# Altium PCB BOARD_4LAYER.PcbDoc (part 18 of 21)
Units mil, origin at the board's own origin, x right, y up, seen from the top; angles counter-clockwise.
Board outline 6692.91 x 10039.37 mil, 4 copper layers (Top Layer, Mid Layer 1, Mid Layer 2, Bottom Layer), stack 66.299 mil thick; 1532 components, 908 nets, 4105 pads, 1286 vias.
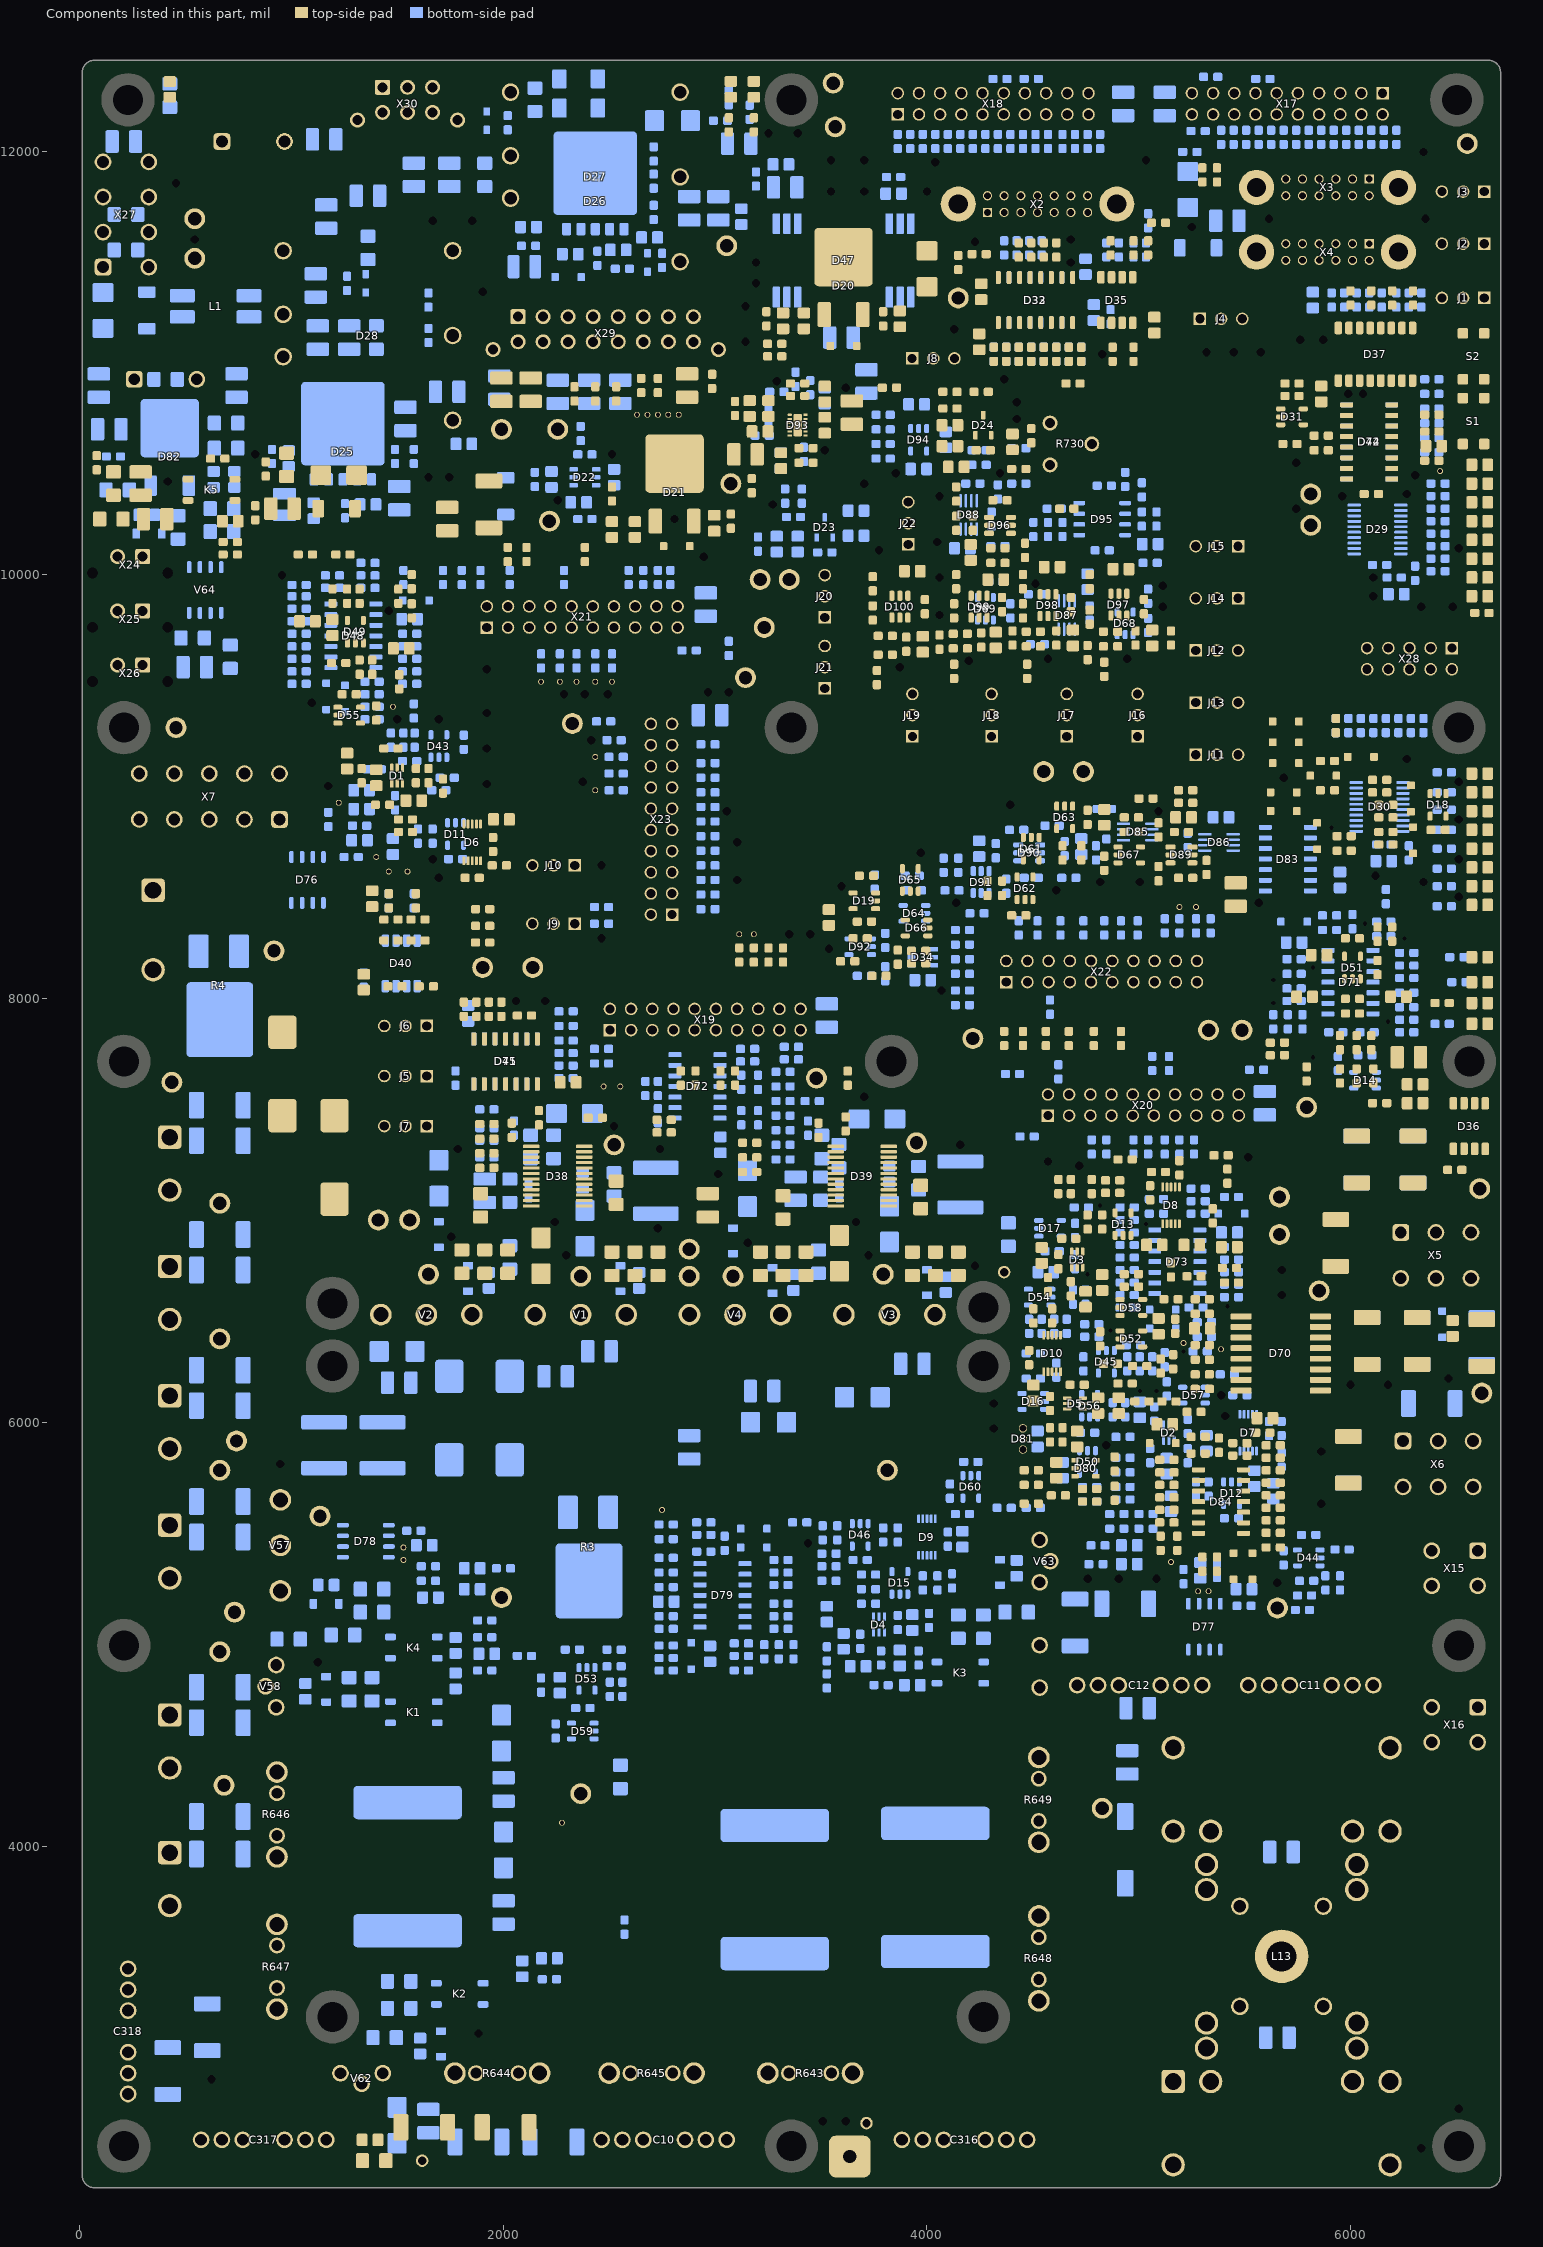
[diagram p20: the components of this part, seen from the top]

## Polygon pours and split planes (outlines as drawn) (continued)
$2N3800 on Bottom Layer "$2N3800_L02_P382" (solid, remove dead copper, pour order 382): 2188.98,7025.59 2238.19,7025.59 2238.19,7104.33 2188.98,7104.33
UL on Bottom Layer "UL_L02_P381" (solid, remove dead copper, pour order 381): 3665.35,6297.24 3192.91,6297.24 3192.91,5913.39 2513.78,5913.39 2513.78,6080.71 3025.59,6080.71 3025.59,6612.2 3163.39,6612.2 3163.39,6366.14 3527.56,6366.14 3527.56,6612.2 3665.35,6612.2
UL on Bottom Layer "UL_L02_P374" (solid, remove dead copper, pour order 374): 17 vertices, not listed, extent 673.23,5913.39 2218.5,8334.65
UL on Bottom Layer "UL_L02_P367" (solid, remove dead copper, pour order 367): 3931.1,6917.32 4009.84,6917.32 4009.84,7015.75 3931.1,7015.75
UL on Bottom Layer "UL_L02_P364" (solid, remove dead copper, pour order 364): 3025.59,6612.2 3124.02,6612.2 3124.02,6809.06 3025.59,6809.06
UL on Bottom Layer "UL_L02_P363" (solid, remove dead copper, pour order 363): 3163.39,6612.2 3124.02,6651.57 3124.02,6612.2
~U_TP on Bottom Layer "~U_TP_L02_P355" (solid, remove dead copper, pour order 355): 948.82,9013.78 131.89,9013.78 131.89,8334.65 614.17,8334.65 614.17,8137.8 407.48,8137.8 407.48,8059.06 43.31,8059.06 43.31,8334.65 33.46,8334.65 33.46,9112.2 948.82,9112.2
U_TP on Bottom Layer "U_TP_L02_P351" (solid, remove dead copper, pour order 351): 1066.93,8393.7 948.82,8393.7 948.82,8433.07 230.31,8433.07 230.31,8895.67 998.03,8895.67 998.03,8797.24 850.39,8797.24 850.39,8511.81 1066.93,8511.81
$2N2430 on Bottom Layer "$2N2430_L02_P349" (solid, remove dead copper, pour order 349): 2100.39,5726.38 1017.72,5726.38 1017.72,5844.49 1657.48,5844.49 1657.48,5903.54 2100.39,5903.54
U_MOST on Bottom Layer "U_MOST_L02_P344" (solid, remove dead copper, pour order 344): 1076.77,5529.53 1185.04,5529.53 1185.04,5667.32 1076.77,5667.32
U_MOST on Bottom Layer "U_MOST_L02_P339" (solid, remove dead copper, pour order 339): 2385.83,5500 2179.13,5500 2110.24,5568.9 1568.9,5568.9 1549.21,5588.58 1303.15,5588.58 1303.15,5450.79 1185.04,5450.79 1185.04,5667.32 1637.8,5667.32 1657.48,5647.64 2159.45,5647.64 2188.98,5677.17 2385.83,5677.17
I_MOST on Bottom Layer "I_MOST_L02_P338" (solid, remove dead copper, pour order 338): 1303.15,5342.52 879.92,5342.52 879.92,5490.16 1165.35,5490.16 1165.35,5440.94 1303.15,5440.94
I_MOST on Bottom Layer "I_MOST_L02_P336" (solid, remove dead copper, pour order 336): 1116.14,5322.83 1303.15,5322.83 1303.15,5342.52 1116.14,5342.52
UH on Bottom Layer "UH_L02_P329" (solid, remove dead copper, pour order 329): 2494.09,6907.48 2572.83,6907.48 2572.83,6986.22 2494.09,6986.22
UH on Bottom Layer "UH_L02_P320" (solid, remove dead copper, pour order 320): 2208.66,6139.76 1588.58,6139.76 1588.58,6730.31 1086.61,6730.31 1086.61,8511.81 1214.57,8511.81 1214.57,6838.58 1706.69,6838.58 1706.69,6366.14 2070.87,6366.14 2070.87,6612.2 2208.66,6612.2
PGND on Bottom Layer "PGND_L02_P315" (solid, remove dead copper, pour order 315): 3960.63,5883.86 4118.11,5883.86 4118.11,6415.35 3960.63,6415.35
PGND on Bottom Layer "PGND_L02_P290" (solid, remove dead copper, pour order 290): 1342.52,6139.76 1480.32,6139.76 1480.32,6641.73 1342.52,6641.73
PGND on Bottom Layer "PGND_L02_P284" (solid, remove dead copper, pour order 284): 3251.97,6061.02 3291.34,6061.02 3291.34,6218.5 3251.97,6218.5
PGND on Bottom Layer "PGND_L02_P283" (solid, remove dead copper, pour order 283): 3291.34,5913.39 3655.51,5913.39 3655.51,6218.5 3291.34,6218.5
PGND on Bottom Layer "PGND_L02_P263" (solid, remove dead copper, pour order 263): 23 vertices, not listed, extent 33.46,2409.45 1824.8,4751.97
PGND on Bottom Layer "PGND_L02_P262" (solid, remove dead copper, pour order 262): 309.06,4751.97 250,4692.91 250,4751.97
PGND on Bottom Layer "PGND_L02_P261" (solid, remove dead copper, pour order 261): 43.31,4751.97 427.17,4751.97 427.17,5165.35 43.31,5165.35
PGND on Bottom Layer "PGND_L02_P254" (solid, remove dead copper, pour order 254): 151.57,5765.75 486.22,5765.75 486.22,5982.28 151.57,5982.28
PGND on Bottom Layer "PGND_L02_P248" (solid, remove dead copper, pour order 248): 466.54,5165.35 33.46,5165.35 33.46,7192.91 486.22,7192.91 486.22,6917.32 151.57,6917.32 151.57,6562.99 505.91,6562.99 505.91,6326.77 151.57,6326.77 151.57,5342.52 466.54,5342.52
PGND on Bottom Layer "PGND_L02_P247" (solid, remove dead copper, pour order 247): 1824.8,2409.45 3104.33,2409.45 3104.33,2448.82 1824.8,2448.82
PGND on Bottom Layer "PGND_L02_P246" (solid, remove dead copper, pour order 246): 2809.06,2448.82 3104.33,2448.82 3104.33,2645.67 2809.06,2645.67
PGND on Bottom Layer "PGND_L02_P235" (solid, remove dead copper, pour order 235): 4462.6,3531.5 4600.39,3531.5 4600.39,3787.4 4462.6,3787.4
PGND on Bottom Layer "PGND_L02_P207" (solid, remove dead copper, pour order 207): 3281.5,6868.11 3360.24,6868.11 3360.24,6966.54 3281.5,6966.54
PGND on Bottom Layer "PGND_L02_P206" (solid, remove dead copper, pour order 206): 2937.01,6169.29 2494.09,6169.29 2494.09,6415.35 2779.53,6415.35 2779.53,6868.11 2937.01,6868.11
PGND on Bottom Layer "PGND_L02_P195" (solid, remove dead copper, pour order 195): 1372.05,6927.17 1618.11,6927.17 1618.11,7045.28 1372.05,7045.28
PGND on Bottom Layer "PGND_L02_P194" (solid, remove dead copper, pour order 194): 1076.77,8777.56 1057.09,8777.56 1057.09,9190.94 574.8,9190.94 574.8,9427.17 43.31,9427.17 43.31,9446.85 594.49,9446.85 594.49,9210.63 1076.77,9210.63
PGND on Bottom Layer "PGND_L02_P193" (solid, remove dead copper, pour order 193): 1372.05,6927.17 1342.52,6927.17 1342.52,7645.67 1273.62,7645.67 1273.62,8511.81 1293.31,8511.81 1293.31,7675.2 1372.05,7675.2
PGND on Bottom Layer "PGND_L02_P188" (solid, remove dead copper, pour order 188): 33.46,9387.8 574.8,9387.8 574.8,9427.17 33.46,9427.17
PGND on Bottom Layer "PGND_L02_P185" (solid, remove dead copper, pour order 185): 4561.02,4299.21 4305.12,4299.21 4305.12,3925.2 3773.62,3925.2 3773.62,4299.21 3094.49,4299.21 3094.49,4683.07 4393.7,4683.07 4393.7,4456.69 4561.02,4456.69
PGND on Bottom Layer "PGND_L02_P183" (solid, remove dead copper, pour order 183): 3970.47,5627.95 2681.1,5627.95 2681.1,5421.26 2631.89,5421.26 2631.89,5431.1 2671.26,5431.1 2671.26,5637.8 3960.63,5637.8 3960.63,5883.86 3970.47,5883.86
PGND on Bottom Layer "PGND_L02_P182" (solid, remove dead copper, pour order 182): 2159.45,5007.87 2631.89,5007.87 2631.89,5450.79 2159.45,5450.79
PGND on Bottom Layer "PGND_L02_P181" (solid, remove dead copper, pour order 181): 1765.75,5440.94 2159.45,5440.94 2159.45,5450.79 1765.75,5450.79
PGND on Bottom Layer "PGND_L02_P180" (solid, remove dead copper, pour order 180): 1765.75,5372.05 2159.45,5372.05 2159.45,5440.94 1765.75,5440.94
$2N2408 on Bottom Layer "$2N2408_L02_P167" (solid, remove dead copper, pour order 167): 3744.09,6612.2 3852.36,6612.2 3852.36,6700.79 3744.09,6700.79
$2N2408 on Bottom Layer "$2N2408_L02_P166" (solid, remove dead copper, pour order 166): 3744.09,6612.2 3763.78,6592.52 3763.78,6612.2
$2N2408 on Bottom Layer "$2N2408_L02_P165" (solid, remove dead copper, pour order 165): 3852.36,6651.57 3891.73,6612.2 3852.36,6612.2
$2N2408 on Bottom Layer "$2N2408_L02_P158" (solid, remove dead copper, pour order 158): 3891.73,5706.69 2572.83,5706.69 2572.83,5500 2405.51,5500 2405.51,5706.69 2297.24,5706.69 2297.24,6740.16 2435.04,6740.16 2435.04,5844.49 3763.78,5844.49 3763.78,6612.2 3891.73,6612.2
U_TS on Bottom Layer "U_TS_L02_P156" (solid, remove dead copper, pour order 156): 6175.2,5637.8 6332.68,5637.8 6332.68,5933.07 6175.2,5933.07
U_TS on Bottom Layer "U_TS_L02_P149" (solid, remove dead copper, pour order 149): 5761.81,6070.87 5919.29,6070.87 5919.29,6307.09 5761.81,6307.09
U_Fin on Bottom Layer "U_FIN_L02_P148" (solid, remove dead copper, pour order 148): 6155.51,6661.42 6312.99,6661.42 6312.99,7015.75 6155.51,7015.75
U_Fin on Bottom Layer "U_FIN_L02_P138" (solid, remove dead copper, pour order 138): 5919.29,6346.46 5761.81,6346.46 5761.81,6681.1 5860.24,6779.53 5919.29,6779.53
U_Fin on Bottom Layer "U_FIN_L02_P137" (solid, remove dead copper, pour order 137): 5919.29,6661.42 6155.51,6661.42 6155.51,6779.53 5919.29,6779.53
~U_TS on Bottom Layer "~U_TS_L02_P133" (solid, remove dead copper, pour order 133): 6529.53,5637.8 6687.01,5637.8 6687.01,6287.4 6529.53,6287.4
~U_Fin on Bottom Layer "~U_FIN_L02_P129" (solid, remove dead copper, pour order 129): 6509.84,6464.57 6687.01,6464.57 6687.01,7212.6 6509.84,7212.6
+U_POWER on Bottom Layer "+U_POWER_L02_P127" (solid, remove dead copper, pour order 127): 820.87,3846.46 742.13,3846.46 742.13,3196.85 230.31,3196.85 230.31,3511.81 643.7,3511.81 643.7,7586.61 820.87,7586.61
+U_POWER on Bottom Layer "+U_POWER_L02_P126" (solid, remove dead copper, pour order 126): 820.87,4476.38 1293.31,4476.38 1293.31,4574.8 820.87,4574.8
+U_POWER on Bottom Layer "+U_POWER_L02_P125" (solid, remove dead copper, pour order 125): 1194.88,4338.58 1293.31,4338.58 1293.31,4476.38 1194.88,4476.38
+U_POWER on Bottom Layer "+U_POWER_L02_P121" (solid, remove dead copper, pour order 121): 820.87,5125.98 1017.72,5125.98 1017.72,5283.46 820.87,5283.46
+U_POWER on Bottom Layer "+U_POWER_L02_P120" (solid, remove dead copper, pour order 120): 1194.88,4043.31 1844.49,4043.31 1844.49,4476.38 1194.88,4476.38
+U_POWER on Bottom Layer "+U_POWER_L02_P119" (solid, remove dead copper, pour order 119): 1844.49,4299.21 2080.71,4299.21 2080.71,4476.38 1844.49,4476.38
$6N134 on Bottom Layer "$6N134_L02_P118" (solid, remove dead copper, pour order 118): 860.24,3846.46 1057.09,3846.46 1057.09,4102.36 860.24,4102.36
$6N134 on Bottom Layer "$6N134_L02_P107" (solid, remove dead copper, pour order 107): 1293.31,2822.83 1372.05,2822.83 1372.05,2901.57 1293.31,2901.57
$6N134 on Bottom Layer "$6N134_L02_P106" (solid, remove dead copper, pour order 106): 1372.05,2724.41 860.24,2724.41 860.24,3393.7 1017.72,3393.7 1017.72,2822.83 1372.05,2822.83
$6N135 on Bottom Layer "$6N135_L02_P102" (solid, remove dead copper, pour order 102): 1923.23,3708.66 2425.2,3708.66 2425.2,3944.88 1923.23,3944.88
$6N135 on Bottom Layer "$6N135_L02_P099" (solid, remove dead copper, pour order 99): 840.55,3492.13 1844.49,3492.13 1844.49,3748.03 840.55,3748.03
$6N135 on Bottom Layer "$6N135_L02_P097" (solid, remove dead copper, pour order 97): 879.92,4181.1 1057.09,4181.1 1057.09,4417.32 879.92,4417.32
$6N135 on Bottom Layer "$6N135_L02_P091" (solid, remove dead copper, pour order 91): 1194.88,3748.03 1844.49,3748.03 1844.49,3807.09 1194.88,3807.09
$6N135 on Bottom Layer "$6N135_L02_P090" (solid, remove dead copper, pour order 90): 1844.49,3708.66 1923.23,3708.66 1923.23,3807.09 1844.49,3807.09
$6N3156 on Bottom Layer "$6N3156_L02_P080" (solid, remove dead copper, pour order 80): 3616.14,3885.83 2927.17,3885.83 2927.17,3078.74 2966.54,3078.74 2966.54,2881.89 2750,2881.89 2750,3925.2 3064.96,4240.16 3616.14,4240.16
$6N3156 on Bottom Layer "$6N3156_L02_P079" (solid, remove dead copper, pour order 79): 2927.17,3078.74 3498.03,3078.74 3498.03,3137.8 2927.17,3137.8
$6N3156 on Bottom Layer "$6N3156_L02_P078" (solid, remove dead copper, pour order 78): 2297.24,3118.11 2750,3118.11 2750,3196.85 2297.24,3196.85
$6N3156 on Bottom Layer "$6N3156_L02_P068" (solid, remove dead copper, pour order 68): 3498.03,2842.52 3734.25,2842.52 3734.25,3137.8 3498.03,3137.8
$6N3156 on Bottom Layer "$6N3156_L02_P066" (solid, remove dead copper, pour order 66): 2021.65,2901.57 2297.24,2901.57 2297.24,3196.85 2021.65,3196.85
$6N106 on Bottom Layer "$6N106_L02_P063" (solid, remove dead copper, pour order 63): 2730.32,2724.41 3124.02,2724.41 3124.02,2783.46 2730.32,2783.46
$6N106 on Bottom Layer "$6N106_L02_P062" (solid, remove dead copper, pour order 62): 3124.02,2724.41 3183.07,2783.46 3124.02,2783.46
$6N106 on Bottom Layer "$6N106_L02_P060" (solid, remove dead copper, pour order 60): 17 vertices, not listed, extent 1431.1,2527.56 3419.29,3059.06
$6N3315 on Bottom Layer "$6N3315_L02_P047" (solid, remove dead copper, pour order 47): 4442.91,3944.88 4600.39,3944.88 4600.39,4181.1 4442.91,4181.1
$6N3315 on Bottom Layer "$6N3315_L02_P046" (solid, remove dead copper, pour order 46): 4462.6,3196.85 4620.08,3196.85 4620.08,3413.39 4462.6,3413.39
+U_AMP on Bottom Layer "+U_AMP_L02_P043" (solid, remove dead copper, pour order 43): 6687.01,5362.2 6273.62,5362.2 6273.62,5027.56 6312.99,4988.19 6312.99,4771.65 6687.01,4771.65 6687.01,4633.86 6214.57,4633.86 6214.57,4870.08 5328.74,4870.08 5328.74,5007.87 6175.2,5007.87 6175.2,5460.63 6687.01,5460.63
$6N94 on Bottom Layer "$6N94_L02_P035" (solid, remove dead copper, pour order 35): 5564.96,2842.52 4856.3,2842.52 4856.3,3472.44 5427.17,3472.44 5427.17,3314.96 5564.96,3314.96
$6N94 on Bottom Layer "$6N94_L02_P031" (solid, remove dead copper, pour order 31): 4127.95,2409.45 3812.99,2409.45 3812.99,3196.85 3025.59,3196.85 3025.59,3688.98 3616.14,3688.98 3616.14,3295.28 3911.42,3295.28 3911.42,2763.78 4127.95,2763.78
$6N101 on Bottom Layer "$6N101_L02_P027" (solid, remove dead copper, pour order 27): 5722.44,4673.23 5584.65,4535.43 5584.65,3669.29 5486.22,3669.29 5486.22,3590.55 4856.3,3590.55 4856.3,3925.2 5072.83,3925.2 5072.83,4555.12 5427.17,4555.12 5427.17,4771.65 5722.44,4771.65
$6N737 on Bottom Layer "$6N737_L02_P023" (solid, remove dead copper, pour order 23): 4226.38,2507.87 5033.46,2507.87 5033.46,2625.98 4226.38,2625.98
$6N737 on Bottom Layer "$6N737_L02_P022" (solid, remove dead copper, pour order 22): 4226.38,2625.98 5742.13,2625.98 5742.13,2724.41 4226.38,2724.41
$6N737 on Bottom Layer "$6N737_L02_P021" (solid, remove dead copper, pour order 21): 6687.01,2803.15 6293.31,2803.15 6293.31,2409.45 5742.13,2409.45 5742.13,3295.28 5879.92,3295.28 5879.92,3472.44 6687.01,3472.44
$6N737 on Bottom Layer "$6N737_L02_P020" (solid, remove dead copper, pour order 20): 5289.37,2409.45 5742.13,2409.45 5742.13,2625.98 5289.37,2625.98
$6N737 on Bottom Layer "$6N737_L02_P016" (solid, remove dead copper, pour order 16): 4777.56,2724.41 4226.38,2724.41 4226.38,2842.52 3990.16,2842.52 3990.16,3374.02 3753.94,3374.02 3753.94,3629.92 4324.8,3629.92 4324.8,3374.02 4088.58,3374.02 4088.58,2980.32 4777.56,2980.32
-U_AMP on Bottom Layer "-U_AMP_L02_P012" (solid, remove dead copper, pour order 12): 6352.36,5165.35 6687.01,5165.35 6687.01,5263.78 6352.36,5263.78
-U_AMP on Bottom Layer "-U_AMP_L02_P011" (solid, remove dead copper, pour order 11): 6687.01,3590.55 5879.92,3590.55 5879.92,3669.29 5761.81,3669.29 5761.81,4437.01 5840.55,4515.75 5840.55,4771.65 6135.83,4771.65 6135.83,4515.75 6687.01,4515.75
no net on Bottom Layer (solid, remove dead copper, pour order 0): 1598.43,5913.39 1647.64,5962.6 1598.43,5962.6
I_AMP on Mid Layer 1 "I_AMP_L-01_P645" (solid, remove dead copper, pour order 645): 4935.04,4692.91 4620.08,4692.91 4620.08,4889.76 4501.97,4889.76 4501.97,5007.87 4935.04,5007.87
GND_UM on Mid Layer 1 "GND_UM_L-01_P597" (solid, remove dead copper, pour order 597): 5153.54,9190.94 3468.5,9190.94 3468.5,10017.72 3793.31,10017.72 3793.31,11051.18 4187.01,11051.18 4187.01,10775.59 4531.5,10775.59 4531.5,10578.74 5153.54,10578.74
GND_UM on Mid Layer 1 "GND_UM_L-01_P596" (solid, remove dead copper, pour order 596): 4059.06,11051.18 4187.01,11051.18 4187.01,11080.71 4059.06,11080.71
GND_UM on Mid Layer 1 "GND_UM_L-01_P595" (solid, remove dead copper, pour order 595): 22 vertices, not listed, extent 3242.13,11080.71 6687.01,12389.76
GND_UM on Mid Layer 1 "GND_UM_L-01_P594" (solid, remove dead copper, pour order 594): 4187.01,10992.13 4275.59,11080.71 4187.01,11080.71
$4N2819 on Mid Layer 1 "$4N2819_L-01_P589" (solid, remove dead copper, pour order 589): 2120.08,11877.95 1942.91,11877.95 1942.91,11700.79 1165.35,11700.79 1165.35,12074.8 2120.08,12074.8
$4N2811 on Mid Layer 1 "$4N2811_L-01_P582" (solid, remove dead copper, pour order 582): 1972.44,11700.79 2120.08,11700.79 2120.08,11838.58 1972.44,11838.58
$4N2807 on Mid Layer 1 "$4N2807_L-01_P581" (solid, remove dead copper, pour order 581): 1559.06,10972.44 1076.77,10972.44 1076.77,11120.08 899.61,11120.08 899.61,11671.26 1559.06,11671.26
$4N2807 on Mid Layer 1 "$4N2807_L-01_P579" (solid, remove dead copper, pour order 579): 909.45,11169.29 1047.24,11169.29 1047.24,11287.4 909.45,11287.4
$4N2806 on Mid Layer 1 "$4N2806_L-01_P571" (solid, remove dead copper, pour order 571): 899.61,10972.44 1047.24,10972.44 1047.24,11090.55 899.61,11090.55
$4N4014 on Mid Layer 1 "$4N4014_L-01_P566" (solid, remove dead copper, pour order 566): 427.17,9761.81 683.07,9761.81 683.07,9899.61 427.17,9899.61
$4N4014 on Mid Layer 1 "$4N4014_L-01_P563" (solid, remove dead copper, pour order 563): 535.43,9496.06 250,9496.06 250,9692.91 427.17,9692.91 427.17,9761.81 535.43,9761.81
$4N4005 on Mid Layer 1 "$4N4005_L-01_P559" (solid, remove dead copper, pour order 559): 250,9742.13 397.64,9742.13 397.64,10175.2 250,10175.2
$4N4005 on Mid Layer 1 "$4N4005_L-01_P553" (solid, remove dead copper, pour order 553): 397.64,9948.82 624.02,9948.82 624.02,10175.2 397.64,10175.2
$4N4008 on Mid Layer 1 "$4N4008_L-01_P550" (solid, remove dead copper, pour order 550): 279.53,10549.21 584.65,10549.21 584.65,10834.65 279.53,10834.65
$4N4016 on Mid Layer 1 "$4N4016_L-01_P543" (solid, remove dead copper, pour order 543): 33.46,9496.06 210.63,9496.06 210.63,10824.8 33.46,10824.8
$4N4016 on Mid Layer 1 "$4N4016_L-01_P542" (solid, remove dead copper, pour order 542): 791.34,10214.57 210.63,10214.57 210.63,10490.16 702.76,10490.16 702.76,10834.65 791.34,10834.65
$4N4016 on Mid Layer 1 "$4N4016_L-01_P538" (solid, remove dead copper, pour order 538): 555.12,9496.06 683.07,9496.06 683.07,9742.13 555.12,9742.13
-U_VENT on Mid Layer 1 "-U_VENT_L-01_P531" (solid, remove dead copper, pour order 531): 1037.4,11710.63 1125.98,11710.63 1125.98,12114.17 1037.4,12114.17
-U_VENT on Mid Layer 1 "-U_VENT_L-01_P530" (solid, remove dead copper, pour order 530): 1037.4,12232.28 1322.83,12232.28 1322.83,12389.76 1037.4,12389.76
-U_VENT on Mid Layer 1 "-U_VENT_L-01_P529" (solid, remove dead copper, pour order 529): 1037.4,11710.63 870.08,11710.63 870.08,10864.17 417.32,10864.17 417.32,10992.13 761.81,10992.13 761.81,12389.76 1037.4,12389.76
-U_VENT on Mid Layer 1 "-U_VENT_L-01_P523" (solid, remove dead copper, pour order 523): 1037.4,12114.17 1657.48,12114.17 1657.48,12232.28 1037.4,12232.28
-U_VENT on Mid Layer 1 "-U_VENT_L-01_P522" (solid, remove dead copper, pour order 522): 338.58,12350.39 761.81,12350.39 761.81,12389.76 338.58,12389.76
+U_VENT on Mid Layer 1 "+U_VENT_L-01_P505" (solid, remove dead copper, pour order 505): 732.28,11021.65 387.8,11021.65 387.8,10864.17 43.31,10864.17 43.31,11070.87 624.02,11070.87 624.02,11838.58 515.75,11838.58 515.75,12320.87 732.28,12320.87
+U_VENT on Mid Layer 1 "+U_VENT_L-01_P504" (solid, remove dead copper, pour order 504): 377.95,12271.65 515.75,12271.65 515.75,12320.87 377.95,12320.87
$4N2816 on Mid Layer 1 "$4N2816_L-01_P500" (solid, remove dead copper, pour order 500): 43.31,11090.55 594.49,11090.55 594.49,11248.03 43.31,11248.03
-U_UM on Mid Layer 1 "-U_UM_L-01_P493" (solid, remove dead copper, pour order 493): 250,11366.14 417.32,11366.14 417.32,12094.49 250,12094.49
+U_UM on Mid Layer 1 "+U_UM_L-01_P490" (solid, remove dead copper, pour order 490): 43.31,11277.56 190.94,11277.56 190.94,12094.49 43.31,12094.49
+15V on Mid Layer 1 "+15V_L-01_P480" (solid, remove dead copper, pour order 480): 3527.56,7409.45 3576.77,7409.45 3576.77,7488.19 3527.56,7488.19
+15V on Mid Layer 1 "+15V_L-01_P478" (solid, remove dead copper, pour order 478): 2080.71,7438.98 2129.92,7438.98 2129.92,7517.72 2080.71,7517.72
GND on Mid Layer 1 "GND_L-01_P398" (solid, remove dead copper, pour order 398): 35 vertices, not listed, extent 1401.57,3324.8 4413.39,6110.24
GND on Mid Layer 1 "GND_L-01_P392" (solid, remove dead copper, pour order 392): 72 vertices, not listed, extent 692.91,5116.14 6687.01,12389.76
GND on Mid Layer 1 "GND_L-01_P391" (solid, remove dead copper, pour order 391): 3379.92,7517.72 3596.46,7517.72 3596.46,7606.3 3379.92,7606.3
$2N3778 on Mid Layer 1 "$2N3778_L-01_P388" (solid, remove dead copper, pour order 388): 3625.98,7025.59 3694.88,7025.59 3694.88,7104.33 3625.98,7104.33
$2N3800 on Mid Layer 1 "$2N3800_L-01_P384" (solid, remove dead copper, pour order 384): 2188.98,7025.59 2287.4,7025.59 2287.4,7104.33 2188.98,7104.33
UL on Mid Layer 1 "UL_L-01_P377" (solid, remove dead copper, pour order 377): 2513.78,5913.39 2720.47,5913.39 2720.47,6100.39 2513.78,6100.39
UL on Mid Layer 1 "UL_L-01_P376" (solid, remove dead copper, pour order 376): 2218.5,5913.39 2139.76,5913.39 2139.76,5962.6 2011.81,5962.6 2011.81,6090.55 2218.5,6090.55
UL on Mid Layer 1 "UL_L-01_P372" (solid, remove dead copper, pour order 372): 663.39,8137.8 889.76,8137.8 889.76,8334.65 663.39,8334.65
UL on Mid Layer 1 "UL_L-01_P371" (solid, remove dead copper, pour order 371): 889.76,8000 1007.87,8000 1007.87,8334.65 889.76,8334.65
UL on Mid Layer 1 "UL_L-01_P361" (solid, remove dead copper, pour order 361): 20 vertices, not listed, extent 3025.59,6326.77 4265.75,7242.13
~U_TP on Mid Layer 1 "~U_TP_L-01_P356" (solid, remove dead copper, pour order 356): 958.66,9013.78 141.73,9013.78 141.73,8334.65 624.02,8334.65 624.02,8137.8 417.32,8137.8 417.32,8059.06 53.15,8059.06 53.15,8334.65 43.31,8334.65 43.31,9112.2 958.66,9112.2
U_TP on Mid Layer 1 "U_TP_L-01_P353" (solid, remove dead copper, pour order 353): 1066.93,8433.07 230.31,8433.07 230.31,8895.67 998.03,8895.67 998.03,8797.24 850.39,8797.24 850.39,8511.81 1066.93,8511.81
$2N2430 on Mid Layer 1 "$2N2430_L-01_P347" (solid, remove dead copper, pour order 347): 1559.06,5716.54 1647.64,5716.54 1647.64,5854.33 1559.06,5854.33
U_MOST on Mid Layer 1 "U_MOST_L-01_P341" (solid, remove dead copper, pour order 341): 2169.29,5490.16 2248.03,5490.16 2248.03,5696.85 2169.29,5696.85
U_MOST on Mid Layer 1 "U_MOST_L-01_P340" (solid, remove dead copper, pour order 340): 1096.46,5529.53 1283.46,5529.53 1283.46,5627.95 1096.46,5627.95
I_MOST on Mid Layer 1 "I_MOST_L-01_P332" (solid, remove dead copper, pour order 332): 1116.14,5322.83 1204.72,5322.83 1204.72,5460.63 1116.14,5460.63
I_MOST on Mid Layer 1 "I_MOST_L-01_P331" (solid, remove dead copper, pour order 331): 870.08,5342.52 1037.4,5342.52 1037.4,5500 870.08,5500
UH on Mid Layer 1 "UH_L-01_P327" (solid, remove dead copper, pour order 327): 1086.61,6917.32 1214.57,6917.32 1214.57,7192.91 1086.61,7192.91
UH on Mid Layer 1 "UH_L-01_P325" (solid, remove dead copper, pour order 325): 1076.77,8187.01 1224.41,8187.01 1224.41,8383.86 1076.77,8383.86
UH on Mid Layer 1 "UH_L-01_P319" (solid, remove dead copper, pour order 319): 18 vertices, not listed, extent 2120.08,6612.2 2838.58,7232.28
UH on Mid Layer 1 "UH_L-01_P318" (solid, remove dead copper, pour order 318): 2208.66,6326.77 1588.58,6326.77 1588.58,6759.84 1706.69,6759.84 1706.69,6366.14 2070.87,6366.14 2070.87,6612.2 2208.66,6612.2
PGND on Mid Layer 1 "PGND_L-01_P308" (solid, remove dead copper, pour order 308): 2169.29,7064.96 2061.02,7064.96 2061.02,6809.06 1952.76,6809.06 1952.76,6690.94 2021.65,6690.94 1952.76,6622.05 1952.76,6612.2 1795.28,6612.2 1795.28,6809.06 1480.32,6809.06 1480.32,7055.12 1903.54,7055.12 1903.54,7153.54 2169.29,7153.54
PGND on Mid Layer 1 "PGND_L-01_P304" (solid, remove dead copper, pour order 304): 2061.02,6736.88 2021.65,6690.94 1952.76,6690.94 1952.76,6809.06 2061.02,6809.06
PGND on Mid Layer 1 "PGND_L-01_P302" (solid, remove dead copper, pour order 302): 1342.52,6139.76 1480.32,6139.76 1480.32,7055.12 1342.52,7055.12
PGND on Mid Layer 1 "PGND_L-01_P294" (solid, remove dead copper, pour order 294): 496.06,7714.57 830.71,7714.57 830.71,8078.74 496.06,8078.74
PGND on Mid Layer 1 "PGND_L-01_P288" (solid, remove dead copper, pour order 288): 3291.34,5893.7 3714.57,5893.7 3714.57,6179.13 3291.34,6179.13
PGND on Mid Layer 1 "PGND_L-01_P277" (solid, remove dead copper, pour order 277): 2937.01,6169.29 2533.46,6169.29 2533.46,6415.35 2779.53,6415.35 2779.53,6612.2 2937.01,6612.2
PGND on Mid Layer 1 "PGND_L-01_P259" (solid, remove dead copper, pour order 259): 250,4653.54 348.43,4751.97 250,4751.97
PGND on Mid Layer 1 "PGND_L-01_P257" (solid, remove dead copper, pour order 257): 35 vertices, not listed, extent 33.46,2409.45 1824.8,7192.91
PGND on Mid Layer 1 "PGND_L-01_P253" (solid, remove dead copper, pour order 253): 151.57,5716.54 486.22,5716.54 486.22,5972.44 151.57,5972.44
PGND on Mid Layer 1 "PGND_L-01_P250" (solid, remove dead copper, pour order 250): 2809.06,2566.93 3143.7,2566.93 3143.7,2704.72 2809.06,2704.72
PGND on Mid Layer 1 "PGND_L-01_P243" (solid, remove dead copper, pour order 243): 1824.8,2409.45 3143.7,2409.45 3143.7,2468.5 1824.8,2468.5
PGND on Mid Layer 1 "PGND_L-01_P242" (solid, remove dead copper, pour order 242): 2809.06,2468.5 3143.7,2468.5 3143.7,2566.93 2809.06,2566.93
PGND on Mid Layer 1 "PGND_L-01_P240" (solid, remove dead copper, pour order 240): 4561.02,4299.21 4305.12,4299.21 4305.12,3925.2 3773.62,3925.2 3773.62,4456.69 4561.02,4456.69
PGND on Mid Layer 1 "PGND_L-01_P237" (solid, remove dead copper, pour order 237): 4561.02,3531.5 4442.91,3531.5 4442.91,3787.4 3773.62,3787.4 3773.62,3925.2 4305.12,3925.2 4305.12,3846.46 4561.02,3846.46
PGND on Mid Layer 1 "PGND_L-01_P233" (solid, remove dead copper, pour order 233): 2139.76,3275.59 1923.23,3275.59 1923.23,3078.74 1667.32,3078.74 1667.32,3295.28 2041.34,3295.28 2041.34,4555.12 1431.1,4555.12 1431.1,4653.54 2139.76,4653.54
PGND on Mid Layer 1 "PGND_L-01_P230" (solid, remove dead copper, pour order 230): 2218.5,5057.09 2562.99,5057.09 2562.99,5440.94 2218.5,5440.94
PGND on Mid Layer 1 "PGND_L-01_P215" (solid, remove dead copper, pour order 215): 3960.63,5893.7 4118.11,5893.7 4118.11,6415.35 3960.63,6415.35
PGND on Mid Layer 1 "PGND_L-01_P210" (solid, remove dead copper, pour order 210): 1431.1,4653.54 1598.43,4653.54 1598.43,4919.29 1431.1,4919.29
PGND on Mid Layer 1 "PGND_L-01_P209" (solid, remove dead copper, pour order 209): 1431.1,4791.34 1312.99,4791.34 1312.99,5263.78 1381.89,5263.78 1381.89,4919.29 1431.1,4919.29
PGND on Mid Layer 1 "PGND_L-01_P205" (solid, remove dead copper, pour order 205): 2779.53,6612.2 2828.74,6671.26 2828.74,6612.2
PGND on Mid Layer 1 "PGND_L-01_P201" (solid, remove dead copper, pour order 201): 3606.3,7064.96 3458.66,7064.96 3458.66,6681.1 3222.44,6681.1 3222.44,6799.21 2937.01,6799.21 2937.01,6612.2 2828.74,6612.2 2828.74,6907.48 3183.07,6907.48 3183.07,7153.54 3606.3,7153.54
PGND on Mid Layer 1 "PGND_L-01_P200" (solid, remove dead copper, pour order 200): 2897.64,6907.48 3183.07,6907.48 3183.07,7025.59 2897.64,7025.59
PGND on Mid Layer 1 "PGND_L-01_P196" (solid, remove dead copper, pour order 196): 19 vertices, not listed, extent 43.31,6799.21 1372.05,9446.85
PGND on Mid Layer 1 "PGND_L-01_P190" (solid, remove dead copper, pour order 190): 33.46,9397.64 574.8,9397.64 574.8,9427.17 33.46,9427.17
PGND on Mid Layer 1 "PGND_L-01_P187" (solid, remove dead copper, pour order 187): 3773.62,4309.06 3045.28,4309.06 2750,4013.78 2750,4190.94 3015.75,4456.69 3773.62,4456.69
$2N2408 on Mid Layer 1 "$2N2408_L-01_P175" (solid, remove dead copper, pour order 175): 3753.94,6395.67 3901.57,6395.67 3901.57,6622.05 3753.94,6622.05
$2N2408 on Mid Layer 1 "$2N2408_L-01_P173" (solid, remove dead copper, pour order 173): 3005.91,5706.69 3891.73,5706.69 3891.73,5834.65 3005.91,5834.65
$2N2408 on Mid Layer 1 "$2N2408_L-01_P170" (solid, remove dead copper, pour order 170): 3744.09,6622.05 3852.36,6622.05 3852.36,6700.79 3744.09,6700.79
$2N2408 on Mid Layer 1 "$2N2408_L-01_P169" (solid, remove dead copper, pour order 169): 2297.24,6385.83 2444.88,6385.83 2444.88,6690.94 2297.24,6690.94
$2N2408 on Mid Layer 1 "$2N2408_L-01_P162" (solid, remove dead copper, pour order 162): 3744.09,6622.05 3753.94,6612.2 3753.94,6622.05
$2N2408 on Mid Layer 1 "$2N2408_L-01_P161" (solid, remove dead copper, pour order 161): 3852.36,6671.26 3901.57,6622.05 3852.36,6622.05
U_TS on Mid Layer 1 "U_TS_L-01_P154" (solid, remove dead copper, pour order 154): 6175.2,5637.8 6312.99,5637.8 6312.99,5933.07 6175.2,5933.07
U_TS on Mid Layer 1 "U_TS_L-01_P151" (solid, remove dead copper, pour order 151): 5761.81,6070.87 5919.29,6070.87 5919.29,6307.09 5761.81,6307.09
U_Fin on Mid Layer 1 "U_FIN_L-01_P146" (solid, remove dead copper, pour order 146): 6155.51,6661.42 6312.99,6661.42 6312.99,7015.75 6155.51,7015.75
U_Fin on Mid Layer 1 "U_FIN_L-01_P142" (solid, remove dead copper, pour order 142): 5919.29,6346.46 5761.81,6346.46 5761.81,6681.1 5860.24,6779.53 5919.29,6779.53
U_Fin on Mid Layer 1 "U_FIN_L-01_P139" (solid, remove dead copper, pour order 139): 5919.29,6661.42 6155.51,6661.42 6155.51,6779.53 5919.29,6779.53
~U_TS on Mid Layer 1 "~U_TS_L-01_P135" (solid, remove dead copper, pour order 135): 6529.53,5637.8 6687.01,5637.8 6687.01,6287.4 6529.53,6287.4
~U_Fin on Mid Layer 1 "~U_FIN_L-01_P131" (solid, remove dead copper, pour order 131): 6509.84,6464.57 6687.01,6464.57 6687.01,7212.6 6509.84,7212.6
+U_POWER on Mid Layer 1 "+U_POWER_L-01_P123" (solid, remove dead copper, pour order 123): 1273.62,4003.94 1844.49,4003.94 1844.49,4338.58 1273.62,4338.58
$6N134 on Mid Layer 1 "$6N134_L-01_P111" (solid, remove dead copper, pour order 111): 643.7,3846.46 978.35,3846.46 978.35,4122.05 643.7,4122.05
$6N134 on Mid Layer 1 "$6N134_L-01_P110" (solid, remove dead copper, pour order 110): 643.7,3216.54 761.81,3216.54 761.81,3846.46 643.7,3846.46
$6N134 on Mid Layer 1 "$6N134_L-01_P109" (solid, remove dead copper, pour order 109): 761.81,3216.54 860.24,3216.54 860.24,3393.7 761.81,3393.7
$6N134 on Mid Layer 1 "$6N134_L-01_P108" (solid, remove dead copper, pour order 108): 1372.05,2763.78 860.24,2763.78 860.24,3393.7 1017.72,3393.7 1017.72,2842.52 1372.05,2842.52
$6N135 on Mid Layer 1 "$6N135_L-01_P105" (solid, remove dead copper, pour order 105): 2326.77,3708.66 2435.04,3708.66 2435.04,3944.88 2326.77,3944.88
$6N135 on Mid Layer 1 "$6N135_L-01_P098" (solid, remove dead copper, pour order 98): 1175.2,3472.44 860.24,3472.44 860.24,3748.03 1057.09,3748.03 1057.09,4200.79 801.18,4200.79 801.18,4338.58 722.44,4417.32 722.44,4811.02 919.29,4811.02 919.29,4712.6 840.55,4712.6 840.55,4476.38 1175.2,4476.38
$6N135 on Mid Layer 1 "$6N135_L-01_P095" (solid, remove dead copper, pour order 95): 1175.2,3472.44 1844.49,3472.44 1844.49,3846.46 1175.2,3846.46
$6N135 on Mid Layer 1 "$6N135_L-01_P087" (solid, remove dead copper, pour order 87): 4580.71,5411.42 4423.23,5411.42 4423.23,5263.78 4374.02,5263.78 4374.02,5431.1 4462.6,5519.69 4580.71,5519.69
$6N135 on Mid Layer 1 "$6N135_L-01_P085" (solid, remove dead copper, pour order 85): 4423.23,5194.88 4324.8,5194.88 4324.8,4525.59 4275.59,4525.59 4275.59,5263.78 4423.23,5263.78
$6N135 on Mid Layer 1 "$6N135_L-01_P084" (solid, remove dead copper, pour order 84): 4275.59,4525.59 2966.54,4525.59 2750,4309.06 2750,4387.8 2956.69,4594.49 4275.59,4594.49
$6N3156 on Mid Layer 1 "$6N3156_L-01_P082" (solid, remove dead copper, pour order 82): 3616.14,3885.83 2927.17,3885.83 2927.17,3059.06 2966.54,3059.06 2966.54,2881.89 2750,2881.89 2750,3915.35 3074.8,4240.16 3616.14,4240.16
$6N3156 on Mid Layer 1 "$6N3156_L-01_P076" (solid, remove dead copper, pour order 76): 2927.17,3059.06 3714.57,3059.06 3714.57,3137.8 2927.17,3137.8
$6N3156 on Mid Layer 1 "$6N3156_L-01_P075" (solid, remove dead copper, pour order 75): 2021.65,3118.11 2750,3118.11 2750,3216.54 2021.65,3216.54
$6N3156 on Mid Layer 1 "$6N3156_L-01_P074" (solid, remove dead copper, pour order 74): 2021.65,2881.89 2238.19,2881.89 2238.19,3118.11 2021.65,3118.11
$6N3156 on Mid Layer 1 "$6N3156_L-01_P069" (solid, remove dead copper, pour order 69): 3517.72,2842.52 3714.57,2842.52 3714.57,3059.06 3517.72,3059.06
$6N106 on Mid Layer 1 "$6N106_L-01_P064" (solid, remove dead copper, pour order 64): 17 vertices, not listed, extent 1411.42,2566.93 3399.61,3059.06
$6N106 on Mid Layer 1 "$6N106_L-01_P057" (solid, remove dead copper, pour order 57): 919.29,4564.96 1352.36,4564.96 1352.36,4702.76 919.29,4702.76
$6N106 on Mid Layer 1 "$6N106_L-01_P056" (solid, remove dead copper, pour order 56): 1253.94,4417.32 1352.36,4417.32 1352.36,4564.96 1253.94,4564.96
$6N106 on Mid Layer 1 "$6N106_L-01_P054" (solid, remove dead copper, pour order 54): 1352.36,4417.32 1982.28,4417.32 1982.28,4476.38 1352.36,4476.38
$6N106 on Mid Layer 1 "$6N106_L-01_P053" (solid, remove dead copper, pour order 53): 1411.42,3000 1509.84,3000 1509.84,3393.7 1411.42,3393.7
$6N106 on Mid Layer 1 "$6N106_L-01_P052" (solid, remove dead copper, pour order 52): 1509.84,3334.65 1982.28,3334.65 1982.28,3393.7 1509.84,3393.7
$6N106 on Mid Layer 1 "$6N106_L-01_P051" (solid, remove dead copper, pour order 51): 1903.54,3393.7 1982.28,3393.7 1982.28,4417.32 1903.54,4417.32
$6N3315 on Mid Layer 1 "$6N3315_L-01_P048" (solid, remove dead copper, pour order 48): 21 vertices, not listed, extent 4364.17,3196.85 4718.5,5401.57
+U_AMP on Mid Layer 1 "+U_AMP_L-01_P044" (solid, remove dead copper, pour order 44): 6293.31,4633.86 6687.01,4633.86 6687.01,4771.65 6293.31,4771.65
+U_AMP on Mid Layer 1 "+U_AMP_L-01_P040" (solid, remove dead copper, pour order 40): 6175.2,5362.2 6687.01,5362.2 6687.01,5480.31 6175.2,5480.31
$6N94 on Mid Layer 1 "$6N94_L-01_P032" (solid, remove dead copper, pour order 32): 5564.96,2842.52 4856.3,2842.52 4856.3,3472.44 5466.54,3472.44 5466.54,3314.96 5564.96,3314.96
$6N94 on Mid Layer 1 "$6N94_L-01_P029" (solid, remove dead copper, pour order 29): 4127.95,2409.45 3812.99,2409.45 3812.99,3196.85 3025.59,3196.85 3025.59,3688.98 3616.14,3688.98 3616.14,3295.28 3911.42,3295.28 3911.42,2763.78 4127.95,2763.78
$6N101 on Mid Layer 1 "$6N101_L-01_P024" (solid, remove dead copper, pour order 24): 5702.76,4673.23 5564.96,4535.43 5564.96,3669.29 5466.54,3669.29 5466.54,3570.87 4836.61,3570.87 4836.61,3925.2 5053.15,3925.2 5053.15,4555.12 5407.48,4555.12 5407.48,4771.65 5702.76,4771.65
$6N737 on Mid Layer 1 "$6N737_L-01_P017" (solid, remove dead copper, pour order 17): 6687.01,2803.15 6293.31,2803.15 6293.31,2409.45 5781.5,2409.45 5781.5,3314.96 5879.92,3314.96 5879.92,3472.44 6687.01,3472.44
$6N737 on Mid Layer 1 "$6N737_L-01_P014" (solid, remove dead copper, pour order 14): 4777.56,2507.87 4226.38,2507.87 4226.38,2842.52 3990.16,2842.52 3990.16,3374.02 3753.94,3374.02 3753.94,3629.92 4324.8,3629.92 4324.8,3374.02 4088.58,3374.02 4088.58,2980.32 4777.56,2980.32
-U_AMP on Mid Layer 1 "-U_AMP_L-01_P008" (solid, remove dead copper, pour order 8): 6687.01,3570.87 5879.92,3570.87 5879.92,3669.29 5781.5,3669.29 5781.5,4456.69 5840.55,4515.75 5840.55,4771.65 6135.83,4771.65 6135.83,4515.75 6687.01,4515.75
-U_AMP on Mid Layer 1 "-U_AMP_L-01_P003" (solid, remove dead copper, pour order 3): 6312.99,5125.98 6687.01,5125.98 6687.01,5263.78 6312.99,5263.78
no net on Mid Layer 1 (solid, remove dead copper, pour order 1): 2996.06,5913.39 3192.91,5913.39 3192.91,6090.55 2996.06,6090.55
I_AMP on Mid Layer 2 "I_AMP_L-01_P646" (solid, remove dead copper, pour order 646): 4935.04,4692.91 4620.08,4692.91 4620.08,4889.76 4482.28,4889.76 4482.28,5007.87 4935.04,5007.87
GND_UM on Mid Layer 2 "GND_UM_L-01_P619" (solid, remove dead copper, pour order 619): 21 vertices, not listed, extent 3242.13,11051.18 6687.01,12389.76
GND_UM on Mid Layer 2 "GND_UM_L-01_P593" (solid, remove dead copper, pour order 593): 5153.54,9190.94 3468.5,9190.94 3468.5,10017.72 3793.31,10017.72 3793.31,11051.18 4187.01,11051.18 4187.01,10775.59 4531.5,10775.59 4531.5,10578.74 5153.54,10578.74
$4N2819 on Mid Layer 2 "$4N2819_L-01_P590" (solid, remove dead copper, pour order 590): 2120.08,11877.95 1942.91,11877.95 1942.91,11700.79 1165.35,11700.79 1165.35,12074.8 2120.08,12074.8
$4N2819 on Mid Layer 2 "$4N2819_L-01_P587" (solid, remove dead copper, pour order 587): 1972.44,11917.32 2120.08,11917.32 2120.08,12035.43 1972.44,12035.43
$4N2811 on Mid Layer 2 "$4N2811_L-01_P583" (solid, remove dead copper, pour order 583): 1972.44,11720.47 2120.08,11720.47 2120.08,11838.58 1972.44,11838.58
$4N2807 on Mid Layer 2 "$4N2807_L-01_P580" (solid, remove dead copper, pour order 580): 1559.06,10972.44 1076.77,10972.44 1076.77,11120.08 899.61,11120.08 899.61,11671.26 1559.06,11671.26
$4N2806 on Mid Layer 2 "$4N2806_L-01_P572" (solid, remove dead copper, pour order 572): 899.61,10972.44 1047.24,10972.44 1047.24,11090.55 899.61,11090.55
$4N4014 on Mid Layer 2 "$4N4014_L-01_P567" (solid, remove dead copper, pour order 567): 427.17,9761.81 683.07,9761.81 683.07,9899.61 427.17,9899.61
$4N4014 on Mid Layer 2 "$4N4014_L-01_P561" (solid, remove dead copper, pour order 561): 250,9496.06 535.43,9496.06 535.43,9663.39 250,9663.39
$4N4005 on Mid Layer 2 "$4N4005_L-01_P560" (solid, remove dead copper, pour order 560): 250,9742.13 397.64,9742.13 397.64,10175.2 250,10175.2
$4N4005 on Mid Layer 2 "$4N4005_L-01_P552" (solid, remove dead copper, pour order 552): 397.64,9948.82 624.02,9948.82 624.02,10175.2 397.64,10175.2
$4N4008 on Mid Layer 2 "$4N4008_L-01_P549" (solid, remove dead copper, pour order 549): 279.53,10549.21 584.65,10549.21 584.65,10834.65 279.53,10834.65
$4N4016 on Mid Layer 2 "$4N4016_L-01_P541" (solid, remove dead copper, pour order 541): 791.34,10214.57 210.63,10214.57 210.63,10490.16 702.76,10490.16 702.76,10834.65 791.34,10834.65
$4N4016 on Mid Layer 2 "$4N4016_L-01_P540" (solid, remove dead copper, pour order 540): 210.63,9683.07 683.07,9683.07 683.07,9722.44 210.63,9722.44
$4N4016 on Mid Layer 2 "$4N4016_L-01_P539" (solid, remove dead copper, pour order 539): 555.12,9496.06 683.07,9496.06 683.07,9683.07 555.12,9683.07
$4N4016 on Mid Layer 2 "$4N4016_L-01_P536" (solid, remove dead copper, pour order 536): 33.46,9496.06 210.63,9496.06 210.63,10824.8 33.46,10824.8
-U_VENT on Mid Layer 2 "-U_VENT_L-01_P533" (solid, remove dead copper, pour order 533): 1125.98,12232.28 1332.68,12232.28 1332.68,12389.76 1125.98,12389.76
-U_VENT on Mid Layer 2 "-U_VENT_L-01_P532" (solid, remove dead copper, pour order 532): 1125.98,11710.63 860.24,11710.63 860.24,10864.17 417.32,10864.17 417.32,10992.13 761.81,10992.13 761.81,12389.76 1125.98,12389.76
-U_VENT on Mid Layer 2 "-U_VENT_L-01_P527" (solid, remove dead copper, pour order 527): 1037.4,12114.17 1726.38,12114.17 1726.38,12232.28 1037.4,12232.28
+U_VENT on Mid Layer 2 "+U_VENT_L-01_P508" (solid, remove dead copper, pour order 508): 732.28,11021.65 387.8,11021.65 387.8,10864.17 43.31,10864.17 43.31,11070.87 624.02,11070.87 624.02,11838.58 515.75,11838.58 515.75,12389.76 732.28,12389.76
$4N2816 on Mid Layer 2 "$4N2816_L-01_P498" (solid, remove dead copper, pour order 498): 43.31,11090.55 594.49,11090.55 594.49,11248.03 43.31,11248.03
-U_UM on Mid Layer 2 "-U_UM_L-01_P496" (solid, remove dead copper, pour order 496): 250,11297.24 417.32,11297.24 417.32,12094.49 250,12094.49
+U_UM on Mid Layer 2 "+U_UM_L-01_P491" (solid, remove dead copper, pour order 491): 43.31,11267.72 190.94,11267.72 190.94,12094.49 43.31,12094.49
+U_UM on Mid Layer 2 "+U_UM_L-01_P487" (solid, remove dead copper, pour order 487): 43.31,11366.14 190.94,11366.14 190.94,12094.49 43.31,12094.49
+15V on Mid Layer 2 "+15V_L-01_P486" (solid, remove dead copper, pour order 486): 2238.19,7488.19 2287.4,7488.19 2287.4,7537.4 2238.19,7537.4
+15V on Mid Layer 2 "+15V_L-01_P485" (solid, remove dead copper, pour order 485): 2129.92,7438.98 2287.4,7438.98 2287.4,7488.19 2129.92,7488.19
+15V on Mid Layer 2 "+15V_L-01_P484" (solid, remove dead copper, pour order 484): 2238.19,7537.4 3576.77,7537.4 3576.77,7586.61 2238.19,7586.61
+15V on Mid Layer 2 "+15V_L-01_P482" (solid, remove dead copper, pour order 482): 3527.56,7409.45 3576.77,7409.45 3576.77,7478.35 3527.56,7478.35
+15V on Mid Layer 2 "+15V_L-01_P476" (solid, remove dead copper, pour order 476): 3527.56,7409.45 3576.77,7409.45 3576.77,7537.4 3527.56,7537.4
+15V on Mid Layer 2 "+15V_L-01_P475" (solid, remove dead copper, pour order 475): 2080.71,7438.98 2129.92,7438.98 2129.92,7537.4 2080.71,7537.4
GND on Mid Layer 2 "GND_L-01_P397" (solid, remove dead copper, pour order 397): 35 vertices, not listed, extent 1401.57,3324.8 4413.39,6110.24
GND on Mid Layer 2 "GND_L-01_P390" (solid, remove dead copper, pour order 390): 84 vertices, not listed, extent 692.91,5116.14 6687.01,12389.76
$2N3778 on Mid Layer 2 "$2N3778_L-01_P387" (solid, remove dead copper, pour order 387): 3625.98,7025.59 3694.88,7025.59 3694.88,7104.33 3625.98,7104.33
$2N3800 on Mid Layer 2 "$2N3800_L-01_P383" (solid, remove dead copper, pour order 383): 2188.98,7025.59 2287.4,7025.59 2287.4,7104.33 2188.98,7104.33
UL on Mid Layer 2 "UL_L-01_P380" (solid, remove dead copper, pour order 380): 3665.35,6238.19 3025.59,6238.19 3025.59,6612.2 3163.39,6612.2 3163.39,6366.14 3527.56,6366.14 3527.56,6612.2 3665.35,6612.2
UL on Mid Layer 2 "UL_L-01_P375" (solid, remove dead copper, pour order 375): 2218.5,5913.39 2149.61,5913.39 2149.61,5962.6 1598.43,5962.6 1598.43,5913.39 889.76,5913.39 889.76,8334.65 1007.87,8334.65 1007.87,6070.87 1618.11,6070.87 1627.95,6080.71 2218.5,6080.71
UL on Mid Layer 2 "UL_L-01_P373" (solid, remove dead copper, pour order 373): 673.23,8137.8 889.76,8137.8 889.76,8334.65 673.23,8334.65
UL on Mid Layer 2 "UL_L-01_P365" (solid, remove dead copper, pour order 365): 3665.35,6238.19 3192.91,6238.19 3192.91,5913.39 2513.78,5913.39 2513.78,6100.39 3025.59,6100.39 3025.59,6759.84 3163.39,6759.84 3163.39,6366.14 3527.56,6366.14 3527.56,6612.2 3665.35,6612.2
UL on Mid Layer 2 "UL_L-01_P360" (solid, remove dead copper, pour order 360): 3665.35,6818.9 3665.35,6326.77 3025.59,6326.77 3025.59,6700.79 3163.39,6700.79 3163.39,6366.14 3527.56,6366.14 3527.56,6976.38 3665.35,6976.38
UL on Mid Layer 2 "UL_L-01_P359" (solid, remove dead copper, pour order 359): 4265.75,6907.48 4177.17,6907.48 4177.17,6720.47 4147.64,6690.94 3921.26,6690.94 3921.26,7242.13 4265.75,7242.13
~U_TP on Mid Layer 2 "~U_TP_L-01_P358" (solid, remove dead copper, pour order 358): 958.66,9013.78 141.73,9013.78 141.73,8334.65 624.02,8334.65 624.02,8147.64 417.32,8147.64 417.32,8059.06 53.15,8059.06 53.15,8334.65 43.31,8334.65 43.31,9112.2 958.66,9112.2
U_TP on Mid Layer 2 "U_TP_L-01_P352" (solid, remove dead copper, pour order 352): 1066.93,8433.07 230.31,8433.07 230.31,8895.67 998.03,8895.67 998.03,8797.24 850.39,8797.24 850.39,8511.81 1066.93,8511.81
$2N2430 on Mid Layer 2 "$2N2430_L-01_P350" (solid, remove dead copper, pour order 350): 2100.39,5726.38 1017.72,5726.38 1017.72,5844.49 1657.48,5844.49 1657.48,5903.54 2100.39,5903.54
U_MOST on Mid Layer 2 "U_MOST_L-01_P346" (solid, remove dead copper, pour order 346): 2385.83,5500 2179.13,5500 2110.24,5568.9 1568.9,5568.9 1549.21,5588.58 1303.15,5588.58 1303.15,5450.79 1185.04,5450.79 1185.04,5667.32 1637.8,5667.32 1657.48,5647.64 2159.45,5647.64 2188.98,5677.17 2385.83,5677.17
U_MOST on Mid Layer 2 "U_MOST_L-01_P345" (solid, remove dead copper, pour order 345): 1076.77,5509.84 1185.04,5509.84 1185.04,5667.32 1076.77,5667.32
I_MOST on Mid Layer 2 "I_MOST_L-01_P337" (solid, remove dead copper, pour order 337): 1303.15,5342.52 879.92,5342.52 879.92,5490.16 1165.35,5490.16 1165.35,5440.94 1303.15,5440.94
I_MOST on Mid Layer 2 "I_MOST_L-01_P335" (solid, remove dead copper, pour order 335): 1096.46,5322.83 1303.15,5322.83 1303.15,5342.52 1096.46,5342.52
UH on Mid Layer 2 "UH_L-01_P324" (solid, remove dead copper, pour order 324): 1086.61,6838.58 1214.57,6838.58 1214.57,8511.81 1086.61,8511.81
UH on Mid Layer 2 "UH_L-01_P323" (solid, remove dead copper, pour order 323): 1086.61,6730.31 1588.58,6730.31 1588.58,6838.58 1086.61,6838.58
UH on Mid Layer 2 "UH_L-01_P322" (solid, remove dead copper, pour order 322): 2208.66,6149.61 1588.58,6149.61 1588.58,6838.58 1706.69,6838.58 1706.69,6366.14 2070.87,6366.14 2070.87,6612.2 2208.66,6612.2
UH on Mid Layer 2 "UH_L-01_P317" (solid, remove dead copper, pour order 317): 2257.87,6789.37 2257.87,6661.42 2208.66,6612.2 2120.08,6612.2 2120.08,6976.38 2257.87,6976.38
UH on Mid Layer 2 "UH_L-01_P316" (solid, remove dead copper, pour order 316): 2838.58,6986.22 2750,6986.22 2750,6681.1 2690.94,6622.05 2533.46,6622.05 2474.41,6681.1 2474.41,6789.37 2435.04,6789.37 2435.04,7232.28 2838.58,7232.28
PGND on Mid Layer 2 "PGND_L-01_P314" (solid, remove dead copper, pour order 314): 3960.63,5814.96 4118.11,5814.96 4118.11,6415.35 3960.63,6415.35
PGND on Mid Layer 2 "PGND_L-01_P313" (solid, remove dead copper, pour order 313): 2041.34,4023.62 2139.76,4023.62 2139.76,4624.02 2041.34,4624.02
PGND on Mid Layer 2 "PGND_L-01_P312" (solid, remove dead copper, pour order 312): 2041.34,3393.7 2139.76,3393.7 2139.76,3620.08 2041.34,3620.08
PGND on Mid Layer 2 "PGND_L-01_P310" (solid, remove dead copper, pour order 310): 2809.06,6612.2 2937.01,6612.2 2937.01,6887.8 2809.06,6887.8
PGND on Mid Layer 2 "PGND_L-01_P309" (solid, remove dead copper, pour order 309): 2937.01,6169.29 2513.78,6169.29 2513.78,6415.35 2779.53,6415.35 2779.53,6582.68 2809.06,6612.2 2937.01,6612.2
PGND on Mid Layer 2 "PGND_L-01_P307" (solid, remove dead copper, pour order 307): 1903.54,7064.96 2169.29,7064.96 2169.29,7153.54 1903.54,7153.54
PGND on Mid Layer 2 "PGND_L-01_P306" (solid, remove dead copper, pour order 306): 1322.83,6927.17 1795.28,6927.17 1795.28,7064.96 1322.83,7064.96
PGND on Mid Layer 2 "PGND_L-01_P305" (solid, remove dead copper, pour order 305): 2061.02,6730.31 1942.91,6612.2 1795.28,6612.2 1795.28,7064.96 2061.02,7064.96
PGND on Mid Layer 2 "PGND_L-01_P295" (solid, remove dead copper, pour order 295): 496.06,7714.57 830.71,7714.57 830.71,8078.74 496.06,8078.74
PGND on Mid Layer 2 "PGND_L-01_P289" (solid, remove dead copper, pour order 289): 1342.52,6149.61 1480.32,6149.61 1480.32,6612.2 1342.52,6612.2
PGND on Mid Layer 2 "PGND_L-01_P285" (solid, remove dead copper, pour order 285): 3291.34,5893.7 3714.57,5893.7 3714.57,6179.13 3291.34,6179.13
PGND on Mid Layer 2 "PGND_L-01_P275" (solid, remove dead copper, pour order 275): 35 vertices, not listed, extent 33.46,2409.45 1824.8,7192.91
PGND on Mid Layer 2 "PGND_L-01_P260" (solid, remove dead copper, pour order 260): 250,4653.54 348.43,4751.97 250,4751.97
PGND on Mid Layer 2 "PGND_L-01_P255" (solid, remove dead copper, pour order 255): 151.57,5716.54 515.75,5716.54 515.75,5962.6 151.57,5962.6
PGND on Mid Layer 2 "PGND_L-01_P245" (solid, remove dead copper, pour order 245): 1824.8,2409.45 3104.33,2409.45 3104.33,2468.5 1824.8,2468.5
PGND on Mid Layer 2 "PGND_L-01_P244" (solid, remove dead copper, pour order 244): 2828.74,2468.5 3104.33,2468.5 3104.33,2645.67 2828.74,2645.67
PGND on Mid Layer 2 "PGND_L-01_P241" (solid, remove dead copper, pour order 241): 4561.02,4299.21 4305.12,4299.21 4305.12,3925.2 3773.62,3925.2 3773.62,4456.69 4561.02,4456.69
PGND on Mid Layer 2 "PGND_L-01_P236" (solid, remove dead copper, pour order 236): 4561.02,3531.5 4442.91,3531.5 4442.91,3787.4 3773.62,3787.4 3773.62,3925.2 4305.12,3925.2 4305.12,3846.46 4561.02,3846.46
PGND on Mid Layer 2 "PGND_L-01_P234" (solid, remove dead copper, pour order 234): 1942.91,3334.65 2139.76,3334.65 2139.76,3393.7 1942.91,3393.7
PGND on Mid Layer 2 "PGND_L-01_P229" (solid, remove dead copper, pour order 229): 2238.19,5076.77 2543.31,5076.77 2543.31,5431.1 2238.19,5431.1
PGND on Mid Layer 2 "PGND_L-01_P213" (solid, remove dead copper, pour order 213): 1942.91,3147.64 2129.92,3334.65 1942.91,3334.65
PGND on Mid Layer 2 "PGND_L-01_P212" (solid, remove dead copper, pour order 212): 1539.37,3078.74 1942.91,3078.74 1942.91,3275.59 1539.37,3275.59
PGND on Mid Layer 2 "PGND_L-01_P211" (solid, remove dead copper, pour order 211): 1431.1,4574.8 2139.76,4574.8 2139.76,4692.91 1431.1,4692.91
PGND on Mid Layer 2 "PGND_L-01_P204" (solid, remove dead copper, pour order 204): 3606.3,7064.96 3458.66,7064.96 3458.66,6681.1 3222.44,6681.1 3222.44,6799.21 2937.01,6799.21 2937.01,6612.2 2828.74,6612.2 2828.74,6907.48 3183.07,6907.48 3183.07,7153.54 3606.3,7153.54
PGND on Mid Layer 2 "PGND_L-01_P199" (solid, remove dead copper, pour order 199): 2809.06,6887.8 2828.74,6887.8 2828.74,6907.48 2809.06,6907.48
PGND on Mid Layer 2 "PGND_L-01_P198" (solid, remove dead copper, pour order 198): 2897.64,6907.48 3183.07,6907.48 3183.07,7025.59 2897.64,7025.59
PGND on Mid Layer 2 "PGND_L-01_P192" (solid, remove dead copper, pour order 192): 33.46,9397.64 574.8,9397.64 574.8,9427.17 33.46,9427.17
PGND on Mid Layer 2 "PGND_L-01_P191" (solid, remove dead copper, pour order 191): 19 vertices, not listed, extent 33.46,6927.17 1372.05,9446.85
PGND on Mid Layer 2 "PGND_L-01_P186" (solid, remove dead copper, pour order 186): 3773.62,4309.06 3045.28,4309.06 2750,4013.78 2750,4190.94 3015.75,4456.69 3773.62,4456.69
PGND on Mid Layer 2 "PGND_L-01_P184" (solid, remove dead copper, pour order 184): 3970.47,5627.95 2681.1,5627.95 2681.1,5431.1 2553.15,5431.1 2553.15,5440.94 2671.26,5440.94 2671.26,5637.8 3960.63,5637.8 3960.63,5814.96 3970.47,5814.96
PGND on Mid Layer 2 "PGND_L-01_P179" (solid, remove dead copper, pour order 179): 2179.13,5027.56 2612.2,5027.56 2612.2,5440.94 2179.13,5440.94
PGND on Mid Layer 2 "PGND_L-01_P178" (solid, remove dead copper, pour order 178): 1431.1,4653.54 1598.43,4653.54 1598.43,4919.29 1431.1,4919.29
PGND on Mid Layer 2 "PGND_L-01_P177" (solid, remove dead copper, pour order 177): 1312.99,4791.34 1460.63,4791.34 1460.63,5263.78 1312.99,5263.78